# Altium PCB filters.PcbDoc
Units mm, origin at the board's own origin, x right, y up, seen from the top; angles counter-clockwise.
Board outline 120 x 70 mm, 4 copper layers (Top Layer, GND_Plane, PWR_Plane, Bottom Layer), stack 0.603 mm thick; 69 components, 49 nets, 179 pads, 184 vias.
Unrouted connection lines stored in the file: 11.
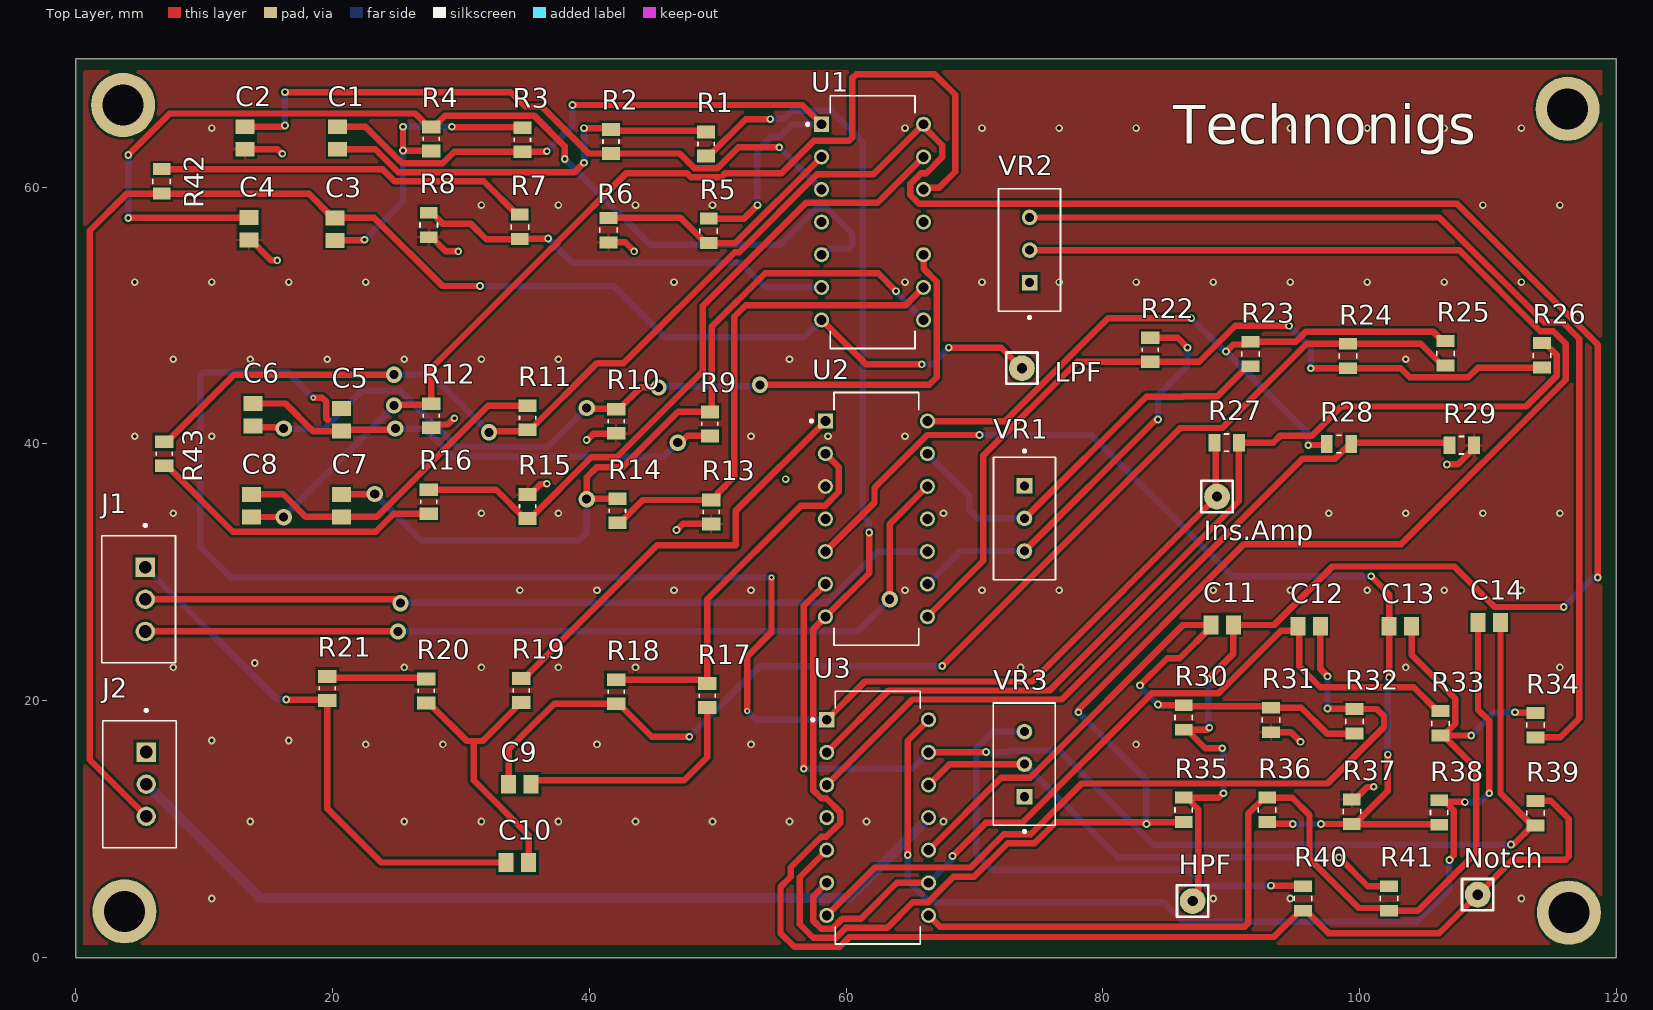
[diagram p0: Top Layer view]
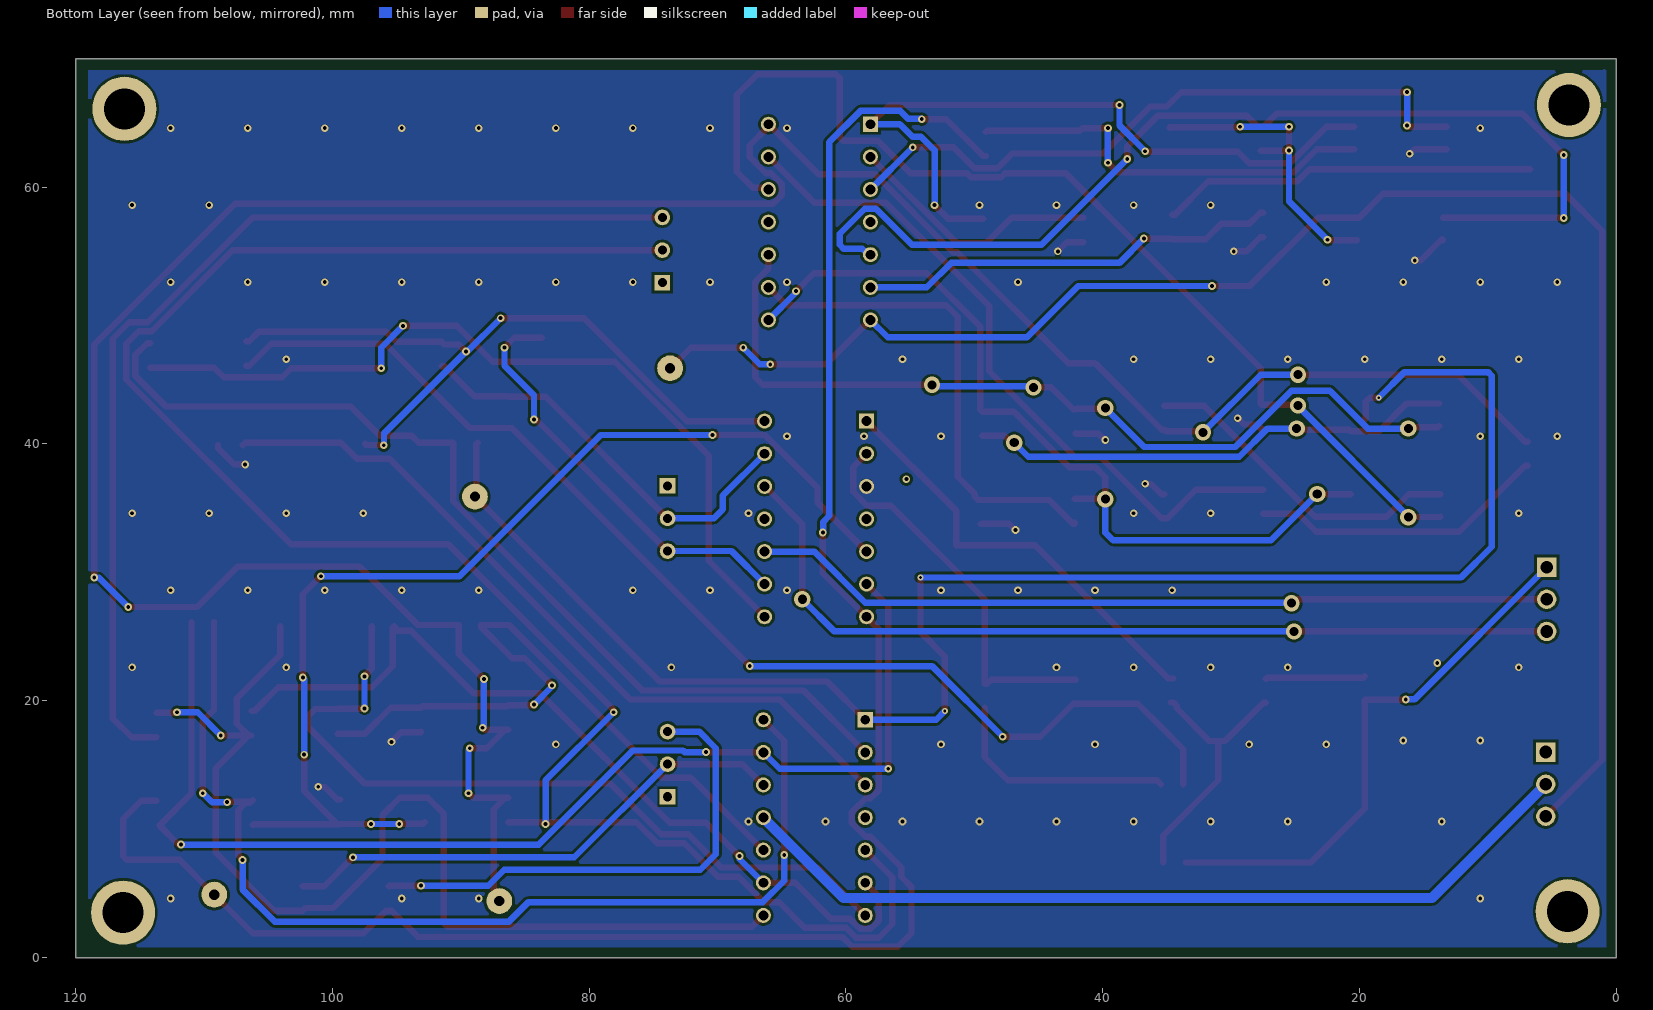
[diagram p1: Bottom Layer view, seen from below]
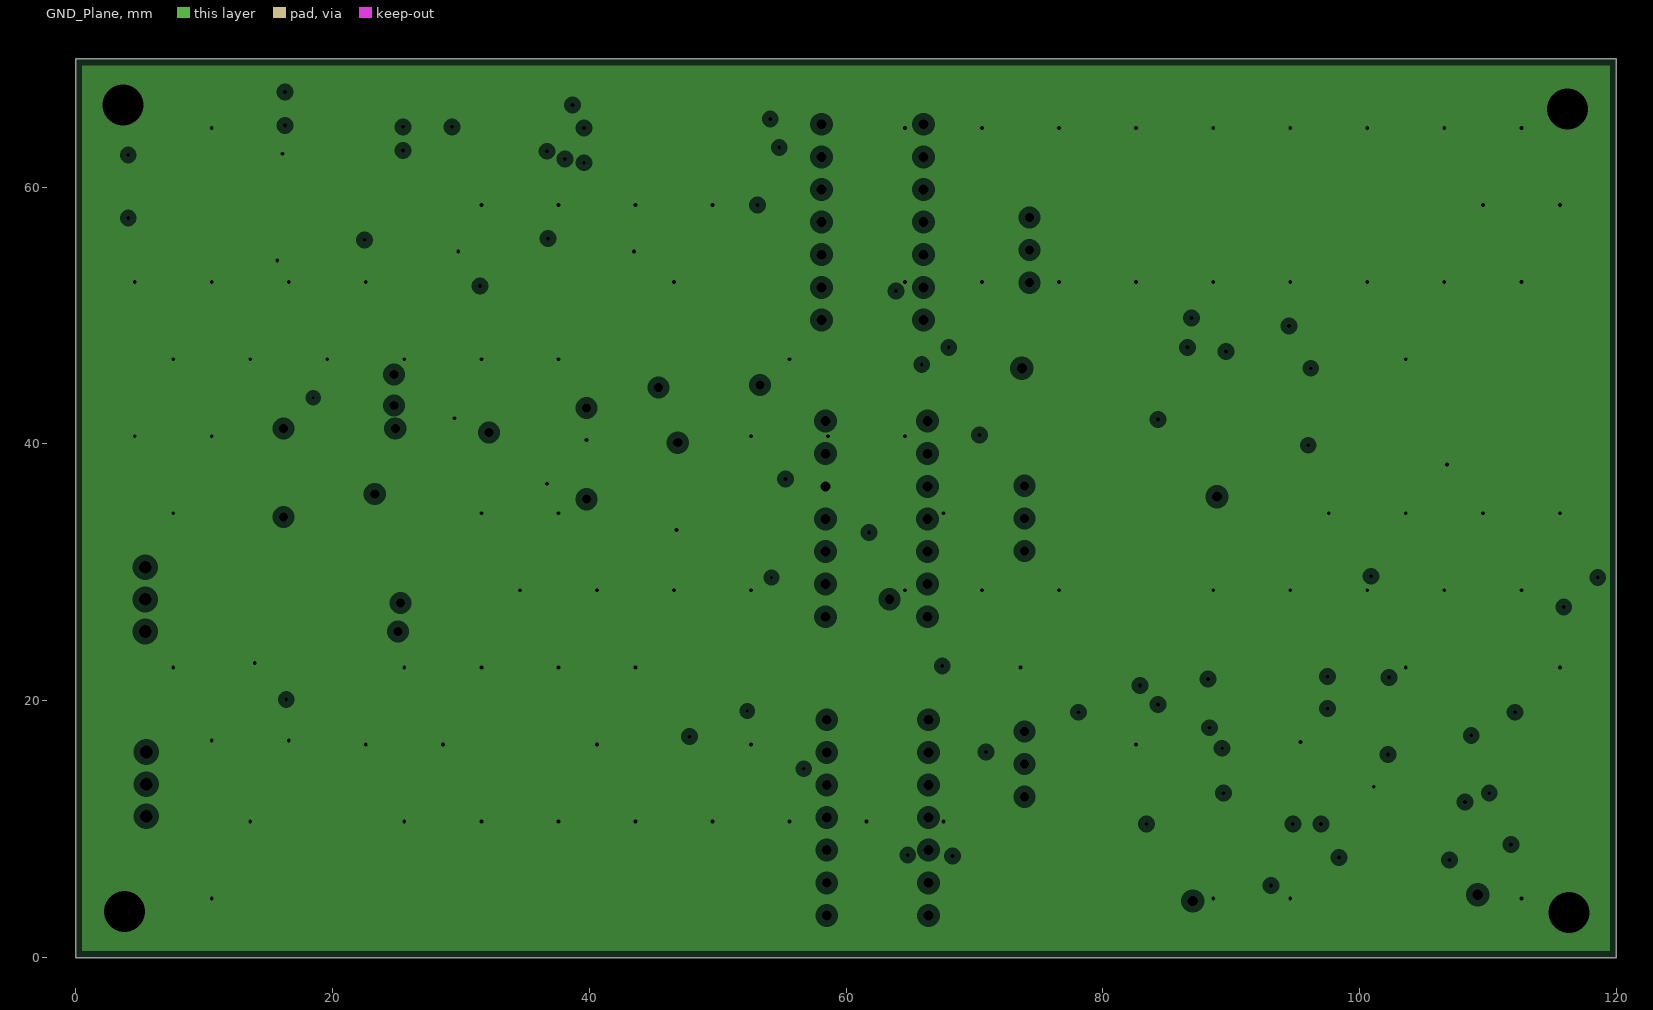
[diagram p2: GND_Plane, clearances drawn from the general rule]
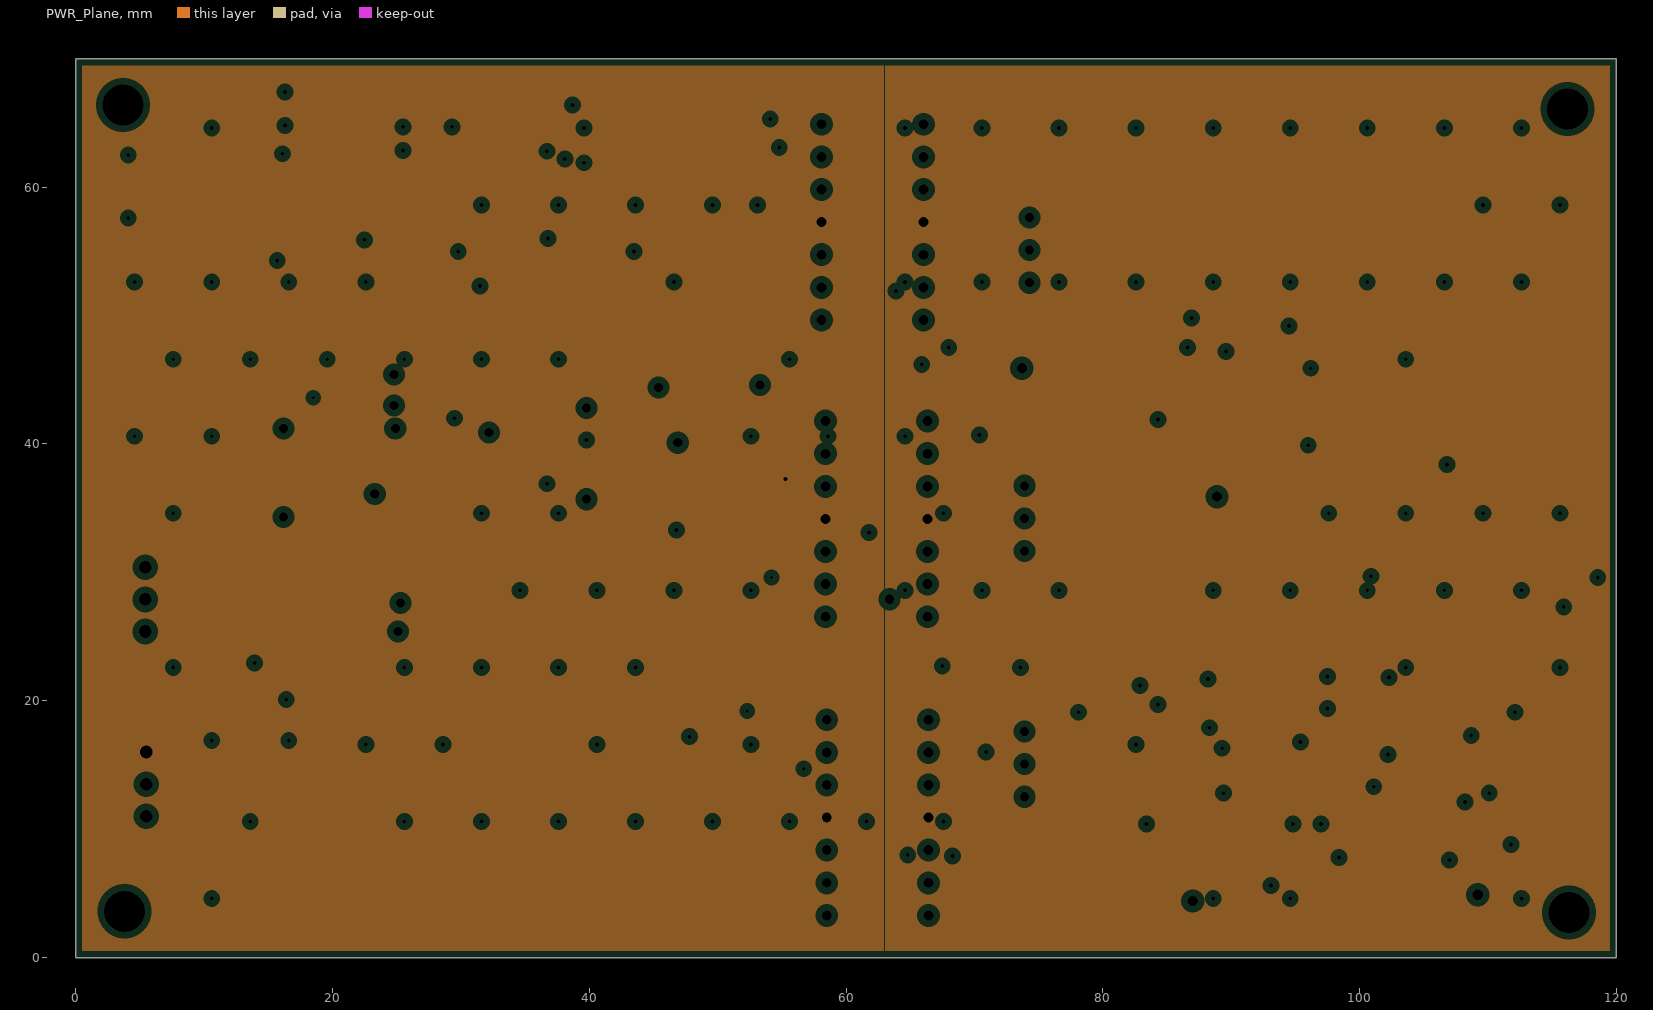
[diagram p3: PWR_Plane, clearances drawn from the general rule]
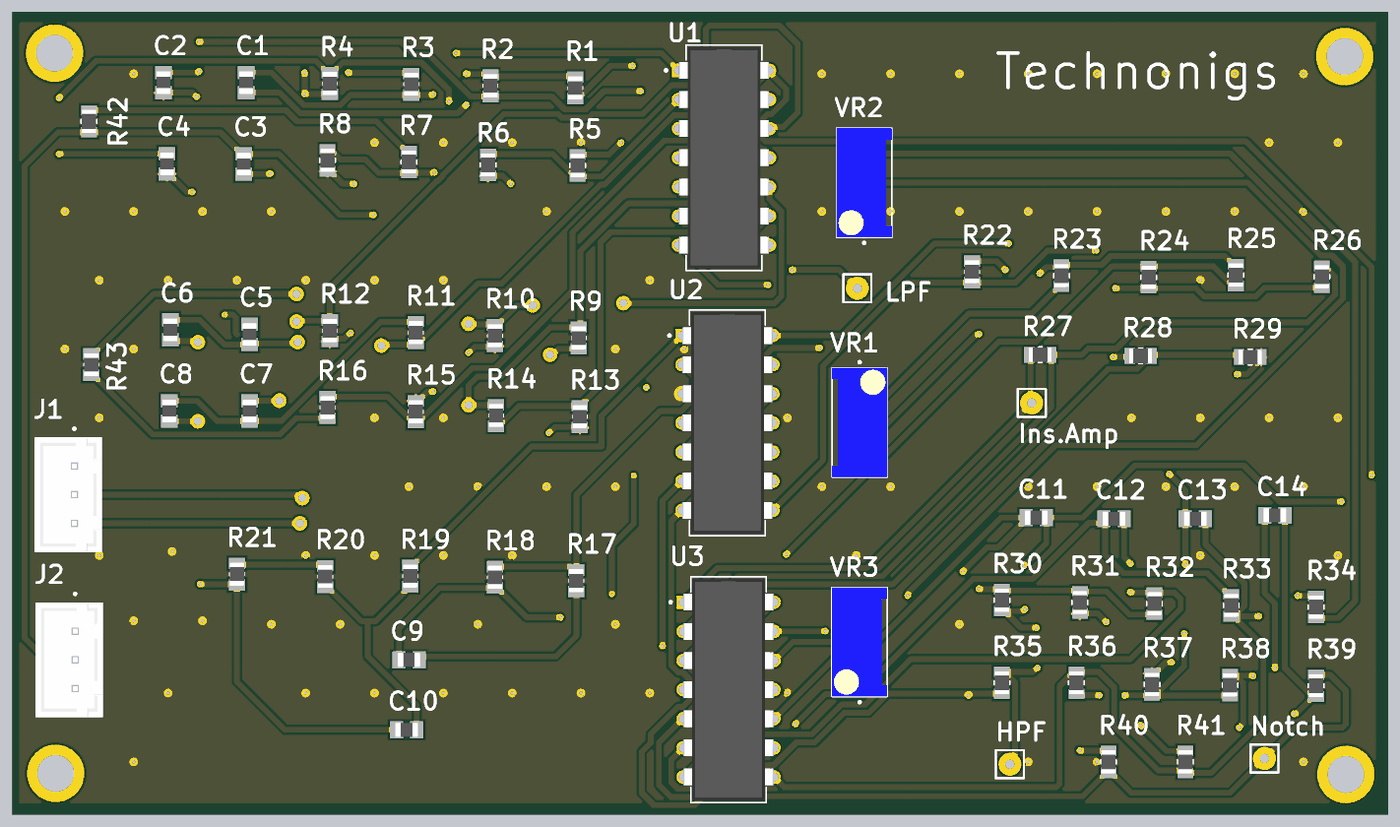
[diagram p4: 3D render of the assembled board from above, using the file's embedded part models]

## Layer stack, top to bottom
Top Solder: solder mask 0.0102, Solder Resist, Dk 3.5
Top Layer: signal copper 0.0356
Dielectric 2: prepreg 0.0711, PP-006, Dk 4.1
GND_Plane: plane copper 0.035, net GND
Dielectric 1: dielectric 0.32, FR-4, Dk 4.8
PWR_Plane: plane copper 0.035, net (Multiple Nets)
Dielectric 3: prepreg 0.0711, PP-006, Dk 4.1
Bottom Layer: signal copper 0.0356
Bottom Solder: solder mask 0.0102, Solder Resist, Dk 3.5

## Board outline
0,0 120,0 120,70 0,70

## Design rules (kind name [scope] priority, off if disabled: settings)
BoardOutlineClearance [All] p1: gap=0.2 ignorepadtopadclearanceinfootprint=FALSE
Clearance ClearanceMidLayer1 [OnLayer('Mid Layer 1') Or IsVia Or IsThruPin vs OnLayer('Mid Layer 1')] p1: gap=0.102 ignorepadtopadclearanceinfootprint=FALSE except(0.127: Arc-Via Track-Via SMDPad-Via THPad-Via Via-Via Via-Fill Via-Poly Via-Region Via-Text; 0.25: Arc-Hole Track-Hole SMDPad-Hole THPad-Hole Via-Hole Fill-Hole Poly-Hole Region-Hole Text-Hole)
Clearance ClearanceTopLayer [OnLayer('Top Layer') Or IsVia Or IsThruPin vs OnLayer('Top Layer') Or IsVia Or IsThruPin] p2: gap=0.203 ignorepadtopadclearanceinfootprint=FALSE except(0.25: Arc-Hole Track-Hole SMDPad-Hole THPad-Hole Via-Hole Fill-Hole Poly-Hole Region-Hole Text-Hole)
Clearance ClearanceBottomLayer [OnLayer('Bottom Layer') Or IsVia Or IsThruPin vs OnLayer('Bottom Layer') Or IsVia Or IsThruPin] p3: gap=0.203 ignorepadtopadclearanceinfootprint=FALSE except(0.25: Arc-Hole Track-Hole SMDPad-Hole THPad-Hole Via-Hole Fill-Hole Poly-Hole Region-Hole Text-Hole)
Clearance ClearanceMidLayer2 [OnLayer('Mid Layer 2') Or IsVia Or IsThruPin vs OnLayer('Mid Layer 2')] p4: gap=0.102 ignorepadtopadclearanceinfootprint=FALSE except(0.127: Arc-Via Track-Via SMDPad-Via THPad-Via Via-Via Via-Fill Via-Poly Via-Region Via-Text; 0.25: Arc-Hole Track-Hole SMDPad-Hole THPad-Hole Via-Hole Fill-Hole Poly-Hole Region-Hole Text-Hole)
ComponentClearance [All] p1: gap=0.102 collisioncheckmode=3 verticalgap=0.102 showdistances=TRUE
DiffPairsRouting [All] p1: maxlimit=0.203 minlimit=0.203 mostfreqgap=0.203 toplayer_minwidth=0.203 toplayer_maxwidth=1816.048 toplayer_prefwidth=0.203 bottomlayer_minwidth=0.203 bottomlayer_maxwidth=1816.048 bottomlayer_prefwidth=0.203 maxuncoupledlength=12.7
Height [All] p1: minheight=0 maxheight=1816.048 prefheight=12.7
HoleSize [All] p1: absolutevalues=TRUE maxlimit=6.3 minlimit=0.2 maxpercent=80.000 minpercent=20.000
HoleToHoleClearance [All] p1: gap=0.25 allowstackedmicrovias=FALSE
MinimumAnnularRing [All] p1: minimumring=0.076
MinimumSolderMaskSliver [All] p1: minsoldermaskwidth=0
PlaneClearance PlaneClearanceMidLayer1 [OnLayer('Mid Layer 1')] p1: clearance=0.102
PlaneClearance PlaneClearanceMidLayer2 [OnLayer('Mid Layer 2')] p2: clearance=0.102
PlaneClearance PlaneClearanceTopLayer [OnLayer('Top Layer')] p3: clearance=0.203
PlaneClearance PlaneClearanceBottomLayer [OnLayer('Bottom Layer')] p4: clearance=0.203
PlaneConnect PlaneConnectTopLayer [OnLayer('Top Layer')] p1: pad.planeconnectstyle=Relief pad.reliefexpansion=0.3 pad.reliefentries=4 pad.reliefconductorwidth=0.203 pad.reliefairgap=0.203 via.planeconnectstyle=Direct via.reliefexpansion=0.3 via.reliefentries=4 via.reliefconductorwidth=0.127 via.reliefairgap=0.127
PlaneConnect PlaneConnectBottomLayer [OnLayer('Bottom Layer')] p2: pad.planeconnectstyle=Relief pad.reliefexpansion=0.3 pad.reliefentries=4 pad.reliefconductorwidth=0.203 pad.reliefairgap=0.203 via.planeconnectstyle=Direct via.reliefexpansion=0.3 via.reliefentries=4 via.reliefconductorwidth=0.127 via.reliefairgap=0.127
PlaneConnect PlaneConnectMidLayer1 [InNet('-5V')] p3: planeconnectstyle=Relief reliefexpansion=0.3 reliefentries=4 reliefconductorwidth=0.102 reliefairgap=0.102
PlaneConnect PlaneConnectMidLayer2 [InNet('+5V')] p4: planeconnectstyle=Relief reliefexpansion=0.3 reliefentries=4 reliefconductorwidth=0.102 reliefairgap=0.102
PolygonConnect PolygonConnectPowerPads [All vs (InPadClass('PowerPads'))] p1: connectstyle=Direct reliefconductorwidth=0.254 reliefentries=4 polygonreliefangle="90 Angle" airgapwidth=0.254
PolygonConnect PolygonConnectMidLayer1 [OnLayer('Mid Layer 1') vs OnLayer('Mid Layer 1')] p2: thpad.connectstyle=Relief thpad.reliefconductorwidth=0.102 thpad.reliefentries=4 thpad.polygonreliefangle="90 Angle" thpad.airgapwidth=0.102 smdpad.connectstyle=Relief smdpad.reliefconductorwidth=0.102 smdpad.reliefentries=4 smdpad.polygonreliefangle="90 Angle" smdpad.airgapwidth=0.102 via.connectstyle=Direct via.reliefconductorwidth=0.127 via.reliefentries=4 via.polygonreliefangle="90 Angle" via.airgapwidth=0.127
PolygonConnect PolygonConnectMidLayer2 [OnLayer('Mid Layer 2') vs OnLayer('Mid Layer 2')] p3: thpad.connectstyle=Relief thpad.reliefconductorwidth=0.102 thpad.reliefentries=4 thpad.polygonreliefangle="90 Angle" thpad.airgapwidth=0.102 smdpad.connectstyle=Relief smdpad.reliefconductorwidth=0.102 smdpad.reliefentries=4 smdpad.polygonreliefangle="90 Angle" smdpad.airgapwidth=0.102 via.connectstyle=Direct via.reliefconductorwidth=0.127 via.reliefentries=4 via.polygonreliefangle="90 Angle" via.airgapwidth=0.127
PolygonConnect PolygonConnectTopLayer [OnLayer('Top Layer') vs OnLayer('Top Layer')] p4: thpad.connectstyle=Relief thpad.reliefconductorwidth=0.203 thpad.reliefentries=4 thpad.polygonreliefangle="90 Angle" thpad.airgapwidth=0.203 smdpad.connectstyle=Relief smdpad.reliefconductorwidth=0.203 smdpad.reliefentries=4 smdpad.polygonreliefangle="90 Angle" smdpad.airgapwidth=0.203 via.connectstyle=Direct via.reliefconductorwidth=0.127 via.reliefentries=4 via.polygonreliefangle="90 Angle" via.airgapwidth=0.127
PolygonConnect PolygonConnectBottomLayer [OnLayer('Bottom Layer') vs OnLayer('Bottom Layer')] p5: thpad.connectstyle=Relief thpad.reliefconductorwidth=0.203 thpad.reliefentries=4 thpad.polygonreliefangle="90 Angle" thpad.airgapwidth=0.203 smdpad.connectstyle=Relief smdpad.reliefconductorwidth=0.203 smdpad.reliefentries=4 smdpad.polygonreliefangle="90 Angle" smdpad.airgapwidth=0.203 via.connectstyle=Direct via.reliefconductorwidth=0.127 via.reliefentries=4 via.polygonreliefangle="90 Angle" via.airgapwidth=0.127
RoutingVias [All] p1: holewidth=0.2 width=0.45 viastyle="Through Hole" minholewidth=0.2 minwidth=0.45 maxholewidth=6.3 maxwidth=6.55
SilkToSilkClearance [All] p1: silktosilkclearance=0
SilkToSolderMaskClearance [IsPad] p1: minsilkscreentomaskgap=0.102 clearancetoexposedcopper=TRUE
SolderMaskExpansion [All] p1: expansion=0.075 istentingtop=FALSE
Width [All] p1: maxlimit=1816.048 minlimit=0.203 preferedwidth=0.203 minimp=50.000000 maximp=50.000000 favimp=50.000000
20 further rules are at their usual default settings.

## Components (designator, comment, footprint, x,y, rotation, side; value= is the part's Value field where it differs from the comment)
C1 "100nF" CAPC2012X145N 20.4,63.83 r90 top
C2 "100nF" CAPC2012X145N 13.2,63.83 r90 top
C3 "100nF" CAPC2012X145N 20.2,56.73 r90 top
C4 "100nF" CAPC2012X145N 13.5,56.755 r90 top
C5 "10uF" CAPC2012X145N 20.7,41.875 r90 top
C6 "10uF" CAPC2012X145N 13.8,42.275 r90 top
C7 "10uF" CAPC2012X145N 20.7,35.2 r90 top
C8 "10uF" CAPC2012X145N 13.7,35.2 r90 top
C9 "10nF" CAPC2012X145N 34.6,13.5 r180 top
C10 "10nF" CAPC2012X145N 34.4,7.4 r0 top
C11 "100nF" CAPC2012X145N 89.3,25.9 r0 top
C12 "100nF" CAPC2012X145N 96.075,25.8 r0 top
C13 "100nF" CAPC2012X145N 103.175,25.8 r0 top
C14 "100nF" CAPC2012X145N 110.1,26.1 r180 top
HPF "net?" MY_TestPin 87,4.4 r0 top
Ins.Amp "net?" MY_TestPin 88.9,35.9 r90 top
J1 "JST_3_PIN" JST_3_Pin 4.9,27.9 r90 top
J2 "JST_3_PIN" JST_3_Pin 4.975,13.5 r90 top
LPF "net?" MY_TestPin 73.7,45.9 r0 top
Notch "net?" MY_TestPin 109.2,4.9 r90 top
R1 "18K" RESC2012X65N 49.1,63.365 r90 top
R2 "18K" RESC2012X65N 41.7,63.555 r270 top
R3 "18K" RESC2012X65N 34.8,63.69 r90 top
R4 "18K" RESC2012X65N 27.7,63.755 r90 top
R5 "1.5K" RESC2012X60N 49.3,56.6 r90 top
R6 "10K" RESC2012X60N 41.5,56.655 r90 top
R7 "12K" RESC2012X60N 34.6,56.91 r90 top
R8 "10K" RESC2012X60N 27.5,57.055 r90 top
R9 "27K" RESC2012X65N 49.4,41.565 r270 top
R10 "27K" RESC2012X65N 42.1,41.765 r90 top
R11 "27K" RESC2012X65N 35.2,42.035 r90 top
R12 "27K" RESC2012X65N 27.7,42.2 r90 top
R13 "10K" RESC2012X65N 49.5,34.7 r270 top
R14 "1.5K" RESC2012X65N 42.2,34.8 r270 top
R15 "10K" RESC2012X65N 35.2,35.135 r90 top
R16 "12K" RESC2012X65N 27.5,35.5 r90 top
R17 "18K" RESC2012X65N 49.2,20.4 r90 top
R18 "1M" RESC2012X65N 42.1,20.7 r90 top
R19 "100k" RESC2012X65N 34.7,20.8 r270 top
R20 "150K" RESC2012X65N 27.3,20.765 r90 top
R21 "220K" RESC2012X65N 19.6,20.965 r270 top
R22 "100K" RESC2012X65N 83.7,47.335 r90 top
R23 "100K" RESC2012X60N 91.5,47 r90 top
R24 "10K" RESC2012X60N 99.1,46.855 r90 top
R25 "10K" RESC2012X60N 106.7,47.055 r90 top
R26 "8.2K" RESC2012X60N 114.2,46.9 r90 top
R27 "43K" RESC2012X60N 89.645,40.1 r180 top
R28 "8.2K" RESC2012X60N 98.4,40 r0 top
R29 "43K" RESC2012X60N 107.955,39.9 r0 top
R30 "680K" RESC2012X60N 86.3,18.7 r90 top
R31 "680K" RESC2012X60N 93.1,18.5 r90 top
R32 "33K" RESC2012X60N 99.6,18.4 r270 top
R33 "33K" RESC2012X60N 106.3,18.245 r90 top
R34 "1K" RESC2012X60N 113.7,18.1 r90 top
R35 "1K" RESC2012X60N 86.3,11.5 r90 top
R36 "680K" RESC2012X60N 92.8,11.5 r90 top
R37 "680K" RESC2012X60N 99.4,11.355 r90 top
R38 "33K" RESC2012X60N 106.2,11.3 r90 top
R39 "33K" RESC2012X60N 113.7,11.245 r90 top
R40 "1K" RESC2012X60N 95.6,4.6 r90 top
R41 "1K" RESC2012X60N 102.3,4.6 r90 top
R42 "0.35K" RESC2012X60N 6.7,60.455 r270 top
R43 "0.35K" RESC2012X65N 6.9,39.235 r270 top
U1 "TL074" TL074CN 62.07,57.28 r0 top
U2 "TL074" TL074CN 62.37,34.16 r0 top
U3 "TL074" TL074CN 62.47,10.9 r0 top
VR1 "3296W-1-103LF" TRIM_3296W-1-103LF 73.9,34.2 r270 top
VR2 "3296W-1-103LF" TRIM_3296W-1-103LF 74.3,55.1 r90 top
VR3 "3296W-1-103LF" TRIM_3296W-1-103LF 73.9,15.06 r90 top

## Footprints (in the part's own frame and the unit in brackets; to place one, negate y for a bottom-side part, rotate by r counter-clockwise, add the part's x,y. Pads: shape width x height; smd on the part's side, far side on the other; paste and mask are expansions set on the pad)
CAPC2012X145N [mm]
  rect 1.16x1.47 smd: 1(-0.875,0) 2(0.875,0)
  body extent -1,-0.63 1,0.63, height 0.7
JST_3_Pin [mm]
  rect 1.508x1.508 / inner round 1.508 / far side rect 1.508x1.508 hole 1 mask+0.102: 1(2.5,-0.525)
  round 1.508 hole 1 mask+0.102: 2(0,-0.525) 3(-2.5,-0.525)
  silkscreen extent -4.95,-2.88 5.85,2.88, body extent -4.95,-2.88 4.95,2.88, height 7
MY_TestPin [mil]
  round 79 hole 31.5: 1(0,0)
  silkscreen extent -48,-48 48,48
RESC2012X60N [mm]
  rect 0.92x1.38 smd: 1(-0.955,0) 2(0.955,0)
  silkscreen extent -0.17,-0.68 0.17,0.68, body extent -1,-0.63 1,0.63, height 0.6
RESC2012X65N [mm]
  rect 1x1.42 smd: 1(-0.935,0) 2(0.935,0)
  silkscreen extent -0.12,-0.63 0.12,0.63, body extent -1,-0.63 1,0.63, height 0.65
TL074CN [mm]
  rect 1.17x1.17 / inner round 1.17 / far side rect 1.17x1.17 hole 0.77 mask+0.102: 1(-3.97,7.62)
  round 1.17 hole 0.77 mask+0.102: 2(-3.97,5.08) 3(-3.97,2.54) 4(-3.97,0) 5(-3.97,-2.54) 6(-3.97,-5.08) 7(-3.97,-7.62) 8(3.97,-7.62) 9(3.97,-5.08) 10(3.97,-2.54) 11(3.97,0) 12(3.97,2.54) 13(3.97,5.08) 14(3.97,7.62)
  silkscreen extent -5.15,-9.84 3.3,9.84, body extent -3.94,-9.65 3.94,9.65, height 5.08
TRIM_3296W-1-103LF [mm]
  rect 1.218x1.218 / inner round 1.218 / far side rect 1.218x1.218 hole 0.71: 1(-2.54,0)
  round 1.218 hole 0.71: 2(0,0) 3(2.54,0)
  silkscreen extent -5.35,-2.41 4.76,2.42, body extent -4.76,-2.41 4.76,2.42, height 11.55

## Part data
C1 C2 C3 C4 C5 C6 C7 C8 C9 C10 C11 C12 C13 C14: library part Capacitor_SMD
HPF Ins.Amp LPF Notch: library part "Test Point", "Test point", ASiD Part Number="Test Point-AS"
R1 R2 R3 R4 R9 R10 R11 R12 R13 R14 R15 R16 R17 R18 R19 R20 R21 R22 R43: library part 0805W8F1802T5E, "18K Ohm 1/8W Thick Film Resistor 0805 Chip - Surface Mount", Package="0805-2 ROYAL", Check_prices=https://www.snapeda.com/parts/0805W8F1802T5E/Uni-Royal/view-part/?ref=eda, MF=Uni-Royal, MP=0805W8F1802T5E, SnapEDA_Link=https://www.snapeda.com/parts/0805W8F1802T5E/Uni-Royal/view-part/?ref=snap
R5 R6 R7 R8 R23 R24 R25 R26 R27 R28 R29 R30 R31 R32 R33 R34 R35 R36 R37 R38 R39 R40 R41 R42: library part "Resistor SMD", "Res Thin Film 0805 18K Ohm 0.1% 0.125W(1/8W) Â±25ppm/C Epoxy Pad SMD T/R", Package="2012 Yageo", Check_prices=https://www.snapeda.com/parts/RT0805BRD0718KL/Yageo/view-part/?ref=eda, MF=Yageo, MP=RT0805BRD0718KL, SnapEDA_Link=https://www.snapeda.com/parts/RT0805BRD0718KL/Yageo/view-part/?ref=snap
VR1 VR2 VR3: "Trimmer, Cermet, Rest 10 Kilohms, PCB, 25 Turns, Pwr-Rtg 0.5W, 3296 Series", Package="NON STANDARD-3 Bourns", Check_prices=https://www.snapeda.com/parts/3296W-1-103LF/Bourns/view-part/?ref=eda, ComponentLink1Description=Datasheet, ComponentLink1URL=https://www.lcsc.com/datasheet/C34846.pdf?spm=wm.sxq.inf.ggs___wm.fly.bg.0.xh&lcsc_vid=E1ENX1FRElJeVAFTE1MMBlZSQFBcBFNRE1VXU1xfE1MxVlNeTldaVlFTQlBdUjsOAxUeFF5JWBYZEEoKFBINSQcJGk4%3D, MF=Bourns, MP=3296W-1-103LF, SnapEDA_Link=https://www.snapeda.com/parts/3296W-1-103LF/Bourns/view-part/?ref=snap
U1 U2 U3: ComponentLink1Description="Data sheet", ComponentLink1URL=https://www.alldatasheet.com/datasheet-pdf/view/28778/TI/TL074.html

## Free pads (board coordinates)
  round 5 hole 3.2: 6(3.7,66.4) 7(3.8,3.6) 9(116.2,66.1) 10(116.3,3.5)

## Via types
v1: diameter 0.6, hole 0.3, Top Layer to Bottom Layer, 166 vias
v2: diameter 1.27, hole 0.711, Top Layer to Bottom Layer, 15 vias
v3: diameter 0.45, hole 0.2, Top Layer to Bottom Layer, 3 vias

## Nets (pads, with @x,y where several pads share a name; then routed paths per layer and width w, separated by ;. In a path a pad name is that pad's centre, name@x,y a point inside that pad or via, vN(x,y) a via of type N, cw(c..) or ccw(c..) an arc to the next point about the centre after c; other vN are vias at no path point)
+5V: J2.1 U1.4 U2.4 U3.4
  other v1: 55.3,37.26
-5V: J2.2 U1.11 U2.11 U3.11 | length 67.2
  Bottom Layer w0.8: J2.2 14.368,4.632 60.172,4.632 U3.11
GND: C2.1 C4.1 pad.6 pad.7 pad.9 pad.10 R6.1 R8.1 R10.1 R12.1 R13.2 R15.2 R29.2 R31.1 R37.2 U2.3 | length 28.1
  Top Layer w0.5: C2.1 15.718,62.955 16.073,62.6 v1(16.1,62.6) ; C4.1 13.5,55.9 13.635,55.9 15.216,54.319 15.681,54.319 v1(15.7,54.3) ; R8.1 27.73,56.1 28.811,55.019 29.781,55.019 v1(29.8,55) ; R12.1 27.7,41.2 28.015,41.515 28.988,41.515 29.473,42 v1(29.5,42) ; R15.2 35.41,36.07 36.221,36.881 36.681,36.881 v1(36.7,36.9) ; v1(39.8,40.3) 39.827,40.3 40.327,40.8 42.1,40.8 R10.1 ; R6.1 42.8,55.7 v1(43.5,55) ; v1(46.8,33.3) 46.827,33.3 47.327,33.8 49.4,33.8 49.435,33.765 R13.2 ; R31.1 93.1,17.6 93.155,17.545 94.655,17.545 v1(95.4,16.8) ; R37.2 99.63,12.31 100.601,13.281 101.081,13.281 v1(101.1,13.3) ; v1(106.8,38.4) 106.819,38.419 107.659,38.419 108.91,39.67 R29.2
  other v1: 10.6,4.6 88.6,4.6 94.6,4.6 112.6,4.6 13.6,10.6 25.6,10.6 31.6,10.6 37.6,10.6 43.6,10.6 49.6,10.6 55.6,10.6 61.6,10.6 67.6,10.6 22.6,16.6 28.6,16.6 40.6,16.6 52.6,16.6 82.6,16.6 10.6,16.903 16.6,16.903 7.6,22.6 25.6,22.6 31.6,22.6 37.6,22.6 43.6,22.6 73.6,22.6 103.6,22.6 115.6,22.6 13.945,22.945 34.6,28.6 40.6,28.6 46.6,28.6 52.6,28.6 64.6,28.6 70.6,28.6 76.6,28.6 88.6,28.6 94.6,28.6 100.6,28.6 106.6,28.6 112.6,28.6 7.6,34.6 31.6,34.6 37.6,34.6 67.6,34.6 97.6,34.6 103.6,34.6 109.6,34.6 115.6,34.6 4.6,40.6 10.6,40.6 52.6,40.6 58.6,40.6 64.6,40.6 7.6,46.6 13.6,46.6 19.6,46.6 25.6,46.6 31.6,46.6 37.6,46.6 55.6,46.6 103.6,46.6 4.6,52.6 10.6,52.6 16.6,52.6 22.6,52.6 46.6,52.6 64.6,52.6 70.6,52.6 76.6,52.6 82.6,52.6 88.6,52.6 94.6,52.6 100.6,52.6 106.6,52.6 112.6,52.6 31.6,58.6 37.6,58.6 43.6,58.6 49.6,58.6 109.6,58.6 115.6,58.6 10.6,64.6 64.6,64.6 70.6,64.6 76.6,64.6 82.6,64.6 88.6,64.6 94.6,64.6 100.6,64.6 106.6,64.6 112.6,64.6
In1+: C2.2 R2.2 U1.3 | length 52
  Top Layer w0.5: C2.2 16.178,64.705 16.273,64.8 v1(16.3,64.8) ; v1(16.3,67.4) 33.9,67.4 35.019,66.281 36.299,66.281 39.96,62.62 R2.2 47.059,62.62 48.202,61.477 49.998,61.477 51.621,63.1 v1(54.8,63.1)
  Bottom Layer w0.5: v1(16.3,64.8) v1(16.3,67.4) ; v1(54.8,63.1) 54.81,63.1 58.09,59.82 U1.3
In1-: R5.1 R6.2 U1.2 | length 20.2
  Top Layer w0.5: R6.2 47.105,57.61 49.07,55.645 R5.1 51.385,55.645 U1.2
In2+: C4.2 R4.2 U1.5 | length 83.1
  Top Layer w0.5: v1(4.1,57.6) 4.115,57.615 13.485,57.615 C4.2 ; v1(4.1,62.5) 7.338,65.738 26.442,65.738 27.49,64.69 R4.2 27.91,64.69 28.798,65.578 35.698,65.578 38.081,63.195 38.081,62.219 v1(38.1,62.2)
  Bottom Layer w0.5: v1(4.1,57.6) v1(4.1,62.5) ; v1(38.1,62.2) 44.8,55.5 54.852,55.5 57.67,58.318 58.53,58.318 60.487,56.361 60.487,55.505 60.195,55.213 58.728,55.213 58.255,54.74 U1.5
In2-: R7.1 R8.2 U1.6 | length 33
  Top Layer w0.5: R8.2 27.73,58.01 28.605,57.135 30.793,57.135 31.973,55.955 R7.1 34.626,55.981 36.781,55.981 v1(36.8,56)
  Bottom Layer w0.5: v1(36.8,56) 38.7,54.1 51.8,54.1 53.7,52.2 U1.6
In3+: C6.1 R10.2 U1.10 | length 68.7
  Top Layer w0.5: C6.1 13.9,41.3 16.1,41.3 v2(16.2,41.2) ; v2(39.8,42.8) 39.85,42.75 42.05,42.75 R10.2 42.31,42.7 44.01,44.4 v2(45.4,44.4) ; v2(53.3,44.6) 66.485,44.6 67.078,45.193 67.078,52.63 66.04,53.668 U1.10
  Bottom Layer w0.5: v2(16.2,41.2) 19.371,41.2 22.31,44.139 25.302,44.139 29.68,39.761 36.761,39.761 v2(39.8,42.8) ; v2(45.4,44.4) 45.5,44.5 53.2,44.5 v2(53.3,44.6)
In3-: R13.1 R14.2 U1.9 | length 39
  Top Layer w0.5: R14.2 42.2,33.8 42.345,33.8 44.18,35.635 R13.1 49.71,35.635 49.96,35.885 49.96,36.095 51.3,37.435 51.3,49.9 52.2,50.8 64.64,50.8 U1.9
In4+: C8.1 R12.2 U1.12 | length 83.5
  Top Layer w0.5: C8.1 13.712,34.313 16.187,34.313 v2(16.2,34.3) ; v2(24.8,43) 24.867,43.067 27.632,43.067 R12.2 27.7,45.9 37.047,55.247 37.112,55.247 37.553,55.688 37.553,55.753 42.9,61.1 47.585,61.1 47.911,60.774 50.289,60.774 50.615,61.1 55,61.1 57.5,63.6 60.207,63.6 60.5,63.893 60.5,68.507 60.793,68.8 66.9,68.8 68.5,67.2 68.5,61.2 67.248,59.948 66.168,59.948 U1.12
  Bottom Layer w0.5: v2(16.2,34.3) 16.2,34.35 24.8,42.95 v2(24.8,43)
In4-: R15.1 R16.2 U1.13 | length 54.1
  Top Layer w0.5: R16.2 32.755,36.435 34.99,34.2 R15.1 35.41,34.2 40.164,38.954 42.147,38.954 48.85,45.657 48.85,50.75 56.882,58.782 62.462,58.782 63.082,59.402 U1.13
In5-: R17.2 R18.2 U2.2 | length 30.9
  Top Layer w0.5: R18.2 48.69,21.635 48.99,21.335 R17.2 49.2,27.9 56.498,35.198 58.366,35.198 59.438,36.27 59.438,38.202 U2.2
In6+: C13.1 R36.1 R37.1 R38.1 U2.5 | length 86
  Top Layer w0.5: U2.5 62.219,35.439 62.219,36.587 66.332,40.7 v1(70.4,40.7) ; R36.1 92.926,10.419 94.781,10.419 v1(94.8,10.4) ; v1(97,10.4) R37.1 99.427,10.373 106.172,10.373 R38.1 ; R37.1@99.63,10.4 102.2,12.97 v1(102.2,15.8) ; v1(100.9,29.7) 102.3,28.3 C13.1 v1(102.3,21.805)
  Bottom Layer w0.5: v1(70.4,40.7) 79.1,40.7 90.1,29.7 v1(100.9,29.7) ; v1(94.8,10.4) v1(97,10.4) ; v1(102.2,15.8) 102.2,21.678 102.3,21.778 v1(102.3,21.805)
In6-: C14.1 R39.1 U2.6 U3.13 | length 92.9
  Top Layer w0.5: v1(56.709,14.7) 56.709,27.389 U2.6 ; U3.13 66.45,15.99 70.89,15.99 v1(70.9,16) ; C14.1 110.975,12.785 113.47,10.29 111.999,8.819 111.819,8.819 v1(111.8,8.8)
  Bottom Layer w0.5: v1(56.709,14.7) 65.16,14.7 U3.13 ; v1(70.9,16) 72.572,16 72.695,16.122 76.613,16.122 83.935,8.8 v1(111.8,8.8)
In7+: J1.2 U2.10 | length 62.7
  Top Layer w0.5: J1.2 24.792,27.9 25.092,27.6 v2(25.3,27.6)
  Bottom Layer w0.5: v2(25.3,27.6) 25.329,27.629 58.489,27.629 62.48,31.62 U2.10
In7-: R22.2 U2.9 VR1.3 | length 33
  Top Layer w0.5: VR1.3 84.121,41.881 84.281,41.881 v1(84.3,41.9) ; R22.2 85.83,48.27 v1(86.6,47.5)
  Bottom Layer w0.5: U2.9 68.92,31.66 VR1.3 ; v1(84.3,41.9) 84.3,43.8 86.6,46.1 v1(86.6,47.5)
In8+: J1.3 U2.12 | length 69
  Top Layer w0.5: J1.3 v2(25.1,25.4) ; v2(63.4,27.9) 63.4,33.76 U2.12
  Bottom Layer w0.5: v2(25.1,25.4) 60.9,25.4 v2(63.4,27.9)
In8-: R23.1 U2.13 VR1.2 | length 32.8
  Top Layer w0.5: VR1.2 83.381,43.681 86.281,43.681 86.3,43.7 88.925,43.7 91.27,46.045 R23.1
  Bottom Layer w0.5: U2.13 69.6,35.98 69.6,34.9 70.3,34.2 VR1.2
In9+: R28.2 R29.1 U3.3 | length 59.6
  Top Layer w0.5: U3.3 65.154,20.094 76.794,20.094 95.557,38.857 98.093,38.857 99.336,40.1 106.8,40.1 R29.1
In9-: R26.2 R27.1 U3.2 | length 74.8
  Top Layer w0.5: U3.2 63.317,20.797 75.857,20.797 90.6,35.54 R27.1 93.282,40.1 93.835,40.653 96.307,40.653 98.573,42.919 112.965,42.919 115.343,45.297 115.343,46.942 114.43,47.855 R26.2
In10+: R35.1 U3.5 VR2.2 | length 148
  Top Layer w0.5: U3.5 56.4,6.26 56.4,2.596 57.457,1.539 59.221,1.539 59.986,2.303 63.203,2.303 65.2,4.3 65.992,4.3 66.01,4.318 66.406,4.318 68.394,6.306 70.001,6.306 72.588,8.894 74.688,8.894 76.339,10.545 83.4,10.545 R35.1 ; VR2.2 107.751,55.1 114.083,48.768 115.078,48.768 116.046,47.8 116.046,45.006 103.243,32.203 91.003,32.203 78.119,19.319 78.119,19.119 v1(78.1,19.1)
  Bottom Layer w0.5: v1(78.1,19.1) 83.4,13.8 v1(83.4,10.4)
In10-: C12.1 R33.2 U3.6 U3.9 | length 66.9
  Top Layer w0.5: U3.6 57.462,4.782 57.462,2.85 58.07,2.242 58.93,2.242 59.695,3.006 61.14,3.006 63.953,5.82 U3.9 ; v1(68.3,7.9) 70.9,10.5 73.739,10.5 83.807,20.568 89.002,20.568 93.87,25.436 94.87,25.436 95.2,25.766 C12.1 95.3,25.7 95.3,22.693 96.941,21.051 104.219,21.051 106.07,19.2 R33.2
  Bottom Layer w0.5: U3.9 68.281,7.661 68.281,7.881 v1(68.3,7.9)
In11+: C11.1 R30.2 R31.2 R32.2 U3.10 | length 55.1
  Top Layer w0.5: U3.10 72.078,13.998 74.34,13.998 86.242,25.9 C11.1 88.425,25.745 85.997,23.317 85.017,23.317 v1(82.9,21.2) ; v1(84.3,19.7) 84.327,19.7 84.372,19.655 R30.2 86.4,19.555 93,19.555 R31.2 95.45,19.455 97.46,17.445 R32.2
  Bottom Layer w0.5: v1(82.9,21.2) 82.919,21.181 82.919,21.081 v1(84.3,19.7)
In12+: R41.2 U3.12 VR3.2 | length 40.5
  Top Layer w0.5: U3.12 68.06,15.06 VR3.2 ; v1(98.4,7.8) 100.645,5.555 R41.2
  Bottom Layer w0.5: VR3.2 81.16,7.8 v1(98.4,7.8)
NetC1_1: C1.1 R1.2 R2.1 | length 32.6
  Top Layer w0.5: C1.1 23.335,62.955 25.127,61.164 38.851,61.164 39.588,61.9 v1(39.6,61.9) ; v1(39.6,64.6) 39.619,64.581 41.609,64.581 R2.1 41.795,64.395 49.005,64.395 R1.2
  Bottom Layer w0.5: v1(39.6,61.9) v1(39.6,64.6)
NetC3_1: C3.1 R3.2 R4.1 | length 23.9
  Top Layer w0.5: C3.1 22.428,55.855 22.473,55.9 v1(22.5,55.9) ; v1(25.5,64.7) v1(25.5,62.85) 25.515,62.835 27.685,62.835 R4.1 ; v1(29.3,64.7) 29.319,64.681 34.744,64.681 R3.2
  Bottom Layer w0.5: v1(22.5,55.9) 25.5,58.9 v1(25.5,62.85) ; v1(25.5,64.7) v1(29.3,64.7)
NetC5_1: C5.1 C6.2 R9.2 | length 38.2
  Top Layer w0.5: C6.2 16.34,43.15 18.49,41 C5.1 20.8,41.1 24.8,41.1 v2(24.9,41.2) ; v2(46.9,40.1) 47.108,40.1 47.638,40.63 R9.2
  Bottom Layer w0.5: v2(24.9,41.2) 27.174,41.2 29.367,39.007 45.807,39.007 v2(46.9,40.1)
NetC7_1: C7.1 C8.2 R11.2 | length 25.8
  Top Layer w0.5: C8.2 16.16,36.075 17.91,34.325 C7.1 23.467,34.325 32.112,42.97 R11.2
NetC9_1: C9.1 R17.1 | length 18.5
  Top Layer w0.5: C9.1 35.775,13.8 47.4,13.8 49.2,15.6 R17.1
NetC10_2: C10.2 R19.2 R20.1 | length 21.2
  Top Layer w0.5: R20.1 27.51,19.83 30.475,16.865 31,16.865 ; R19.2 34.49,19.865 34.24,19.615 34.24,19.405 31.7,16.865 31,16.865 ; C10.2 35.275,9.525 31,13.8 31,16.865
NetR7_2: R7.2 R42.1 | length 29.4
  Top Layer w0.5: R42.1 23.886,61.41 24.835,60.46 31.775,60.46 34.37,57.865 R7.2
NetR16_1: R16.1 R43.2 | length 23.3
  Top Layer w0.5: R43.2 7.11,38.3 12.249,33.161 23.37,33.161 24.774,34.565 R16.1
NetR20_2: R20.2 R21.1 | length 7.8
  Top Layer w0.5: R21.1 19.7,21.8 27.2,21.8 R20.2
NetR34_1: R34.1 VR2.3 | length 80.3
  Top Layer w0.5: VR2.3 106.206,57.64 114.375,49.471 115.829,49.471 117.1,48.2 117.1,18.621 115.624,17.145 R34.1
NetR40_2: R40.2 VR3.3 | length 39
  Top Layer w0.5: v1(93.1,5.6) 93.119,5.581 95.574,5.581 R40.2
  Bottom Layer w0.5: VR3.3 71.435,17.6 70.147,16.312 70.147,8.053 71.364,6.836 86.624,6.836 87.86,5.6 v1(93.1,5.6)
out1: C1.2 R3.1 R5.2 U1.1 | length 56.7
  Top Layer w0.5: C1.2 22.58,64.705 25.172,62.113 25.192,62.113 25.439,61.867 28.598,61.867 29.486,62.755 R3.1 36.628,62.755 36.673,62.8 v1(36.7,62.8) ; v1(38.7,66.4) 56.6,66.4 U1.1 ; R5.2 52.055,57.555 v1(53.1,58.6)
  Bottom Layer w0.5: v1(36.7,62.8) 38.7,64.8 v1(38.7,66.4) ; v1(53.1,58.6) 53.1,62.865 54.158,63.923 54.823,63.923 55.8,64.9 U1.1
out2: C3.2 J2.3 LPF.1 R42.2 U1.7 | length 129.1
  Top Layer w0.5: J2.3 1.1,15.4 1.1,56.6 4,59.5 R42.2 18.15,59.5 20.045,57.605 C3.2 23.261,57.605 28.566,52.3 v1(31.5,52.3) ; U1.7 61.56,46.2 v1(65.9,46.2) ; v1(68,47.5) 72.1,47.5 LPF.1
  Bottom Layer w0.5: v1(31.5,52.3) 41.902,52.3 45.902,48.3 56.74,48.3 U1.7 ; v1(65.9,46.2) 65.919,46.219 66.719,46.219 v1(68,47.5)
out3: C7.2 R9.1 R14.1 U1.8 | length 65.8
  Top Layer w0.5: C7.2 20.712,36.087 23.287,36.087 v2(23.3,36.1) ; R14.1 42.182,35.717 39.817,35.717 v2(39.8,35.7) 39.8,37.4 40.6,38.2 42.62,38.2 46.92,42.5 R9.1 49.553,42.653 49.553,49.147 53.706,53.3 62.5,53.3 v1(63.9,51.9)
  Bottom Layer w0.5: v2(23.3,36.1) 26.9,32.5 39.2,32.5 39.8,33.1 v2(39.8,35.7) ; v1(63.9,51.9) 63.919,51.881 63.919,51.781 U1.8
out4: C11.2 HPF.1 R11.1 R30.1 R35.2 R43.1 U1.14 | length 219.7
  Top Layer w0.5: R43.1 7.11,40.17 12.34,45.4 v2(24.8,45.4) ; v2(32.2,40.9) 32.3,41 35.1,41 R11.1 35.41,41.1 40.61,46.3 42.7,46.3 51.342,54.942 51.676,54.942 57.734,61 62.14,61 U1.14 66.04,64.726 67.5,63.266 67.5,62.352 66.238,61.09 65.842,61.09 65.002,60.25 65.002,59.39 65.69,58.702 107.592,58.702 118.55,47.744 v1(118.55,29.6) ; HPF.1 87,4.808 87.443,5.251 87.443,11.542 86.53,12.455 R35.2 89.028,12.455 89.373,12.8 v1(89.4,12.8) ; v1(88.2,21.7) 90.175,23.675 C11.2 93.339,25.9 97.893,30.453 107.378,30.453 110.531,27.3 v1(115.9,27.3) ; v1(88.3,17.9) 88.273,17.9 88.118,17.745 R30.1 86.53,17.745 87.975,16.3 v1(89.3,16.3)
  Bottom Layer w0.5: v2(24.8,45.4) 27.7,45.4 v2(32.2,40.9) ; v1(88.2,21.7) 88.2,18.027 88.3,17.927 v1(88.3,17.9) ; v1(89.3,16.3) 89.3,16.273 89.4,16.173 v1(89.4,12.8) ; v1(115.9,27.3) 118.181,29.581 118.531,29.581 v1(118.55,29.6)
out5: R19.1 U2.1 | length 33.8
  Top Layer w0.5: R19.1@34.49,21.735 R19.1 34.91,21.735 45.275,32.1 51.4,32.1 51.4,34.78 U2.1
out6: Notch.1 R1.1 R39.2 R40.1 U2.7 | length 153.6
  Top Layer w0.5: R1.1 49.31,62.43 52.18,65.3 v1(54.1,65.3) ; v1(61.8,33.1) 61.8,29.94 U2.7 58.4,26.528 57.462,25.59 57.462,13.01 58.07,12.402 58.466,12.402 59.538,11.33 59.538,10.47 58.466,9.398 58.07,9.398 55.697,7.025 55.697,6.29 54.9,5.493 54.9,1.893 55.957,0.835 59.513,0.835 60.277,1.6 93.325,1.6 95.37,3.645 R40.1 ; R40.1@95.83,3.645 97.575,1.9 106.2,1.9 Notch.1 111.9,7.6 116.007,7.6 116.3,7.893 116.3,10.8 114.9,12.2 R39.2
  Bottom Layer w0.5: v1(54.1,65.3) 54.115,65.315 55.15,65.315 55.773,65.938 58.873,65.938 61.3,63.511 61.3,34.4 61.781,33.919 61.781,33.119 v1(61.8,33.1)
out7: R22.1 R24.1 R26.1 U2.8 | length 65
  Top Layer w0.5: U2.8 70.7,30.9 70.7,39.1 78,46.4 R22.1 87.512,46.4 90.312,49.2 v1(94.5,49.2) ; v1(96.2,45.9) R24.1 103.202,45.9 103.915,45.187 108.459,45.187 109.217,45.945 R26.1
  Bottom Layer w0.5: v1(94.5,49.2) 96.2,47.5 v1(96.2,45.9)
out8: R23.2 R25.2 R28.1 U2.14 | length 57.1
  Top Layer w0.5: U2.14 72.386,41.78 80.406,49.8 v1(86.9,49.8) ; v1(89.6,47.2) 89.627,47.2 90.172,47.745 91.29,47.745 R23.2 95.026,47.955 95.794,48.723 105.757,48.723 106.47,48.01 R25.2 ; v1(96,39.9) 96.019,39.919 97.364,39.919 R28.1
  Bottom Layer w0.5: v1(86.9,49.8) 89.481,47.219 89.581,47.219 v1(89.6,47.2) 95.981,40.819 95.981,39.919 v1(96,39.9)
out9: Ins.Amp.1 R27.2 U3.1 | length 130.8
  Top Layer w0.5: v3(18.5,43.6) 19.219,43.6 19.512,43.307 19.512,41.982 19.62,41.874 ; v3(52.3,19.2) 52.3,23.45 54.2,25.35 v3(54.2,29.6) ; U3.1 61.48,21.5 74.5,21.5 88.848,35.848 88.848,35.953 Ins.Amp.1 88.795,36.005 88.795,39.995 R27.2
  Bottom Layer w0.5: v3(18.5,43.6) 16.5,45.6 9.993,45.6 9.7,45.307 9.7,32 12.1,29.6 v3(54.2,29.6) ; v3(52.3,19.2) 52.98,18.52 U3.1
out10: C12.2 R32.1 U3.7 | length 61.6
  Top Layer w0.5: U3.7 62.229,7.009 69.709,7.009 72.297,9.597 74.397,9.597 78.353,13.553 97.499,13.553 101.9,17.954 101.9,18.8 101.345,19.355 R32.1 99.574,19.381 97.519,19.381 v1(97.5,19.4) ; C12.2 96.95,22.477 97.5,21.927 v1(97.5,21.9)
  Bottom Layer w0.5: v1(97.5,19.4) v1(97.5,21.9)
out11: C13.2 R33.1 R34.2 R36.2 R41.1 U3.8 | length 88.1
  Top Layer w0.5: U3.8 67.32,2.4 91.041,2.4 91.334,2.693 91.334,11.219 92.57,12.455 R36.2 94.745,12.455 96.1,11.1 96.1,7.7 99.945,3.855 102.09,3.855 R41.1 104.545,3.645 109.1,8.2 109.1,14.7 106.74,17.06 106.74,17.08 R33.1@106.53,17.29 ; C13.2 104.05,23.571 107.443,20.178 107.443,18.203 R33.1@106.53,17.29 ; R33.1 R33.1@106.53,17.29 ; R33.1@106.74,17.295 108.695,17.295 v1(108.7,17.3) ; v1(112.1,19.1) 112.119,19.081 113.674,19.081 R34.2
  Bottom Layer w0.5: v1(108.7,17.3) 110.5,19.1 v1(112.1,19.1)
out12: C14.2 R38.2 U3.14 | length 83.4
  Top Layer w0.5: v1(64.809,7.991) 64.809,16.889 U3.14 ; v1(107,7.6) 107,7.627 107.343,7.97 107.343,11.457 106.755,12.045 106.41,12.045 R38.2 106.336,12.119 108.181,12.119 v1(108.2,12.1) ; C14.2 109.225,19.309 110.1,18.434 v1(110.1,12.8)
  Bottom Layer w0.5: v1(64.809,7.991) 64.809,5.983 66.474,4.318 84.728,4.318 86.246,2.8 104.5,2.8 107,5.3 v1(107,7.6) ; v1(108.2,12.1) 109.373,12.1 110.073,12.8 v1(110.1,12.8)
RLD: C9.2 R18.1 R24.2 R25.1 | length 91.6
  Top Layer w0.5: C9.2 33.725,16.225 35.395,17.895 37.265,19.765 R18.1 42.31,19.765 44.875,17.2 v1(47.8,17.2) ; v1(67.5,22.7) 86.043,41.243 89.308,41.243 95.875,47.81 R24.2 104.76,47.81 106.47,46.1 R25.1
  Bottom Layer w0.5: v1(47.8,17.2) 53.3,22.7 v1(67.5,22.7)
RLD_PIN: C10.1 J1.1 R21.2 | length 42.6
  Top Layer w0.5: v1(16.4,20.1) 16.419,20.081 19.549,20.081 R21.2 19.6,11.6 23.8,7.4 C10.1
  Bottom Layer w0.5: J1.1 15.725,20.1 v1(16.4,20.1)
pads on no net: C5.2 VR1.1 VR2.1 VR3.1

## Polygon pours and split planes (outlines as drawn)
GND on Bottom Layer "GND_L04_P000" (solid, pour order 0): 1,69.2 1.1,69.1 119,69.1 119,1.2 118.6,0.8 0.8,0.8 0.8,69.1 0.9,69.2
GND on Top Layer "GND_L01_P001" (solid, pour order 1): 118.9,69.1 118.9,1.2 118.7,1 0.6,1 0.6,69 0.7,69.1
+5V on PWR_Plane (split plane): 62.973,0.51 0.51,0.51 0.51,69.49 62.973,69.49
-5V on PWR_Plane (split plane): 119.49,0.51 63.027,0.51 63.027,69.49 119.49,69.49
GND on GND_Plane (split plane): 119.49,0.51 0.51,0.51 0.51,69.49 119.49,69.49

## Other copper
PWR_Plane (plane layer: these items are gaps in the copper):
  lines w0.051: 63,0.5 63,70.4

## Silkscreen, mask and mechanical layers (free items; w line width, h text height)
Top Overlay:
  text "Technonigs" at 85.5,63.4 h3